# Altium PCB sdc-le-a3l.PcbDoc
Units mm, origin at the board's own origin, x right, y up, seen from the top; angles counter-clockwise.
Board outline 35.8 x 37.7 mm, 2 copper layers (Top Layer, Bottom Layer), stack 1.58 mm thick; 1 components, 0 nets, 36 pads, 0 vias.
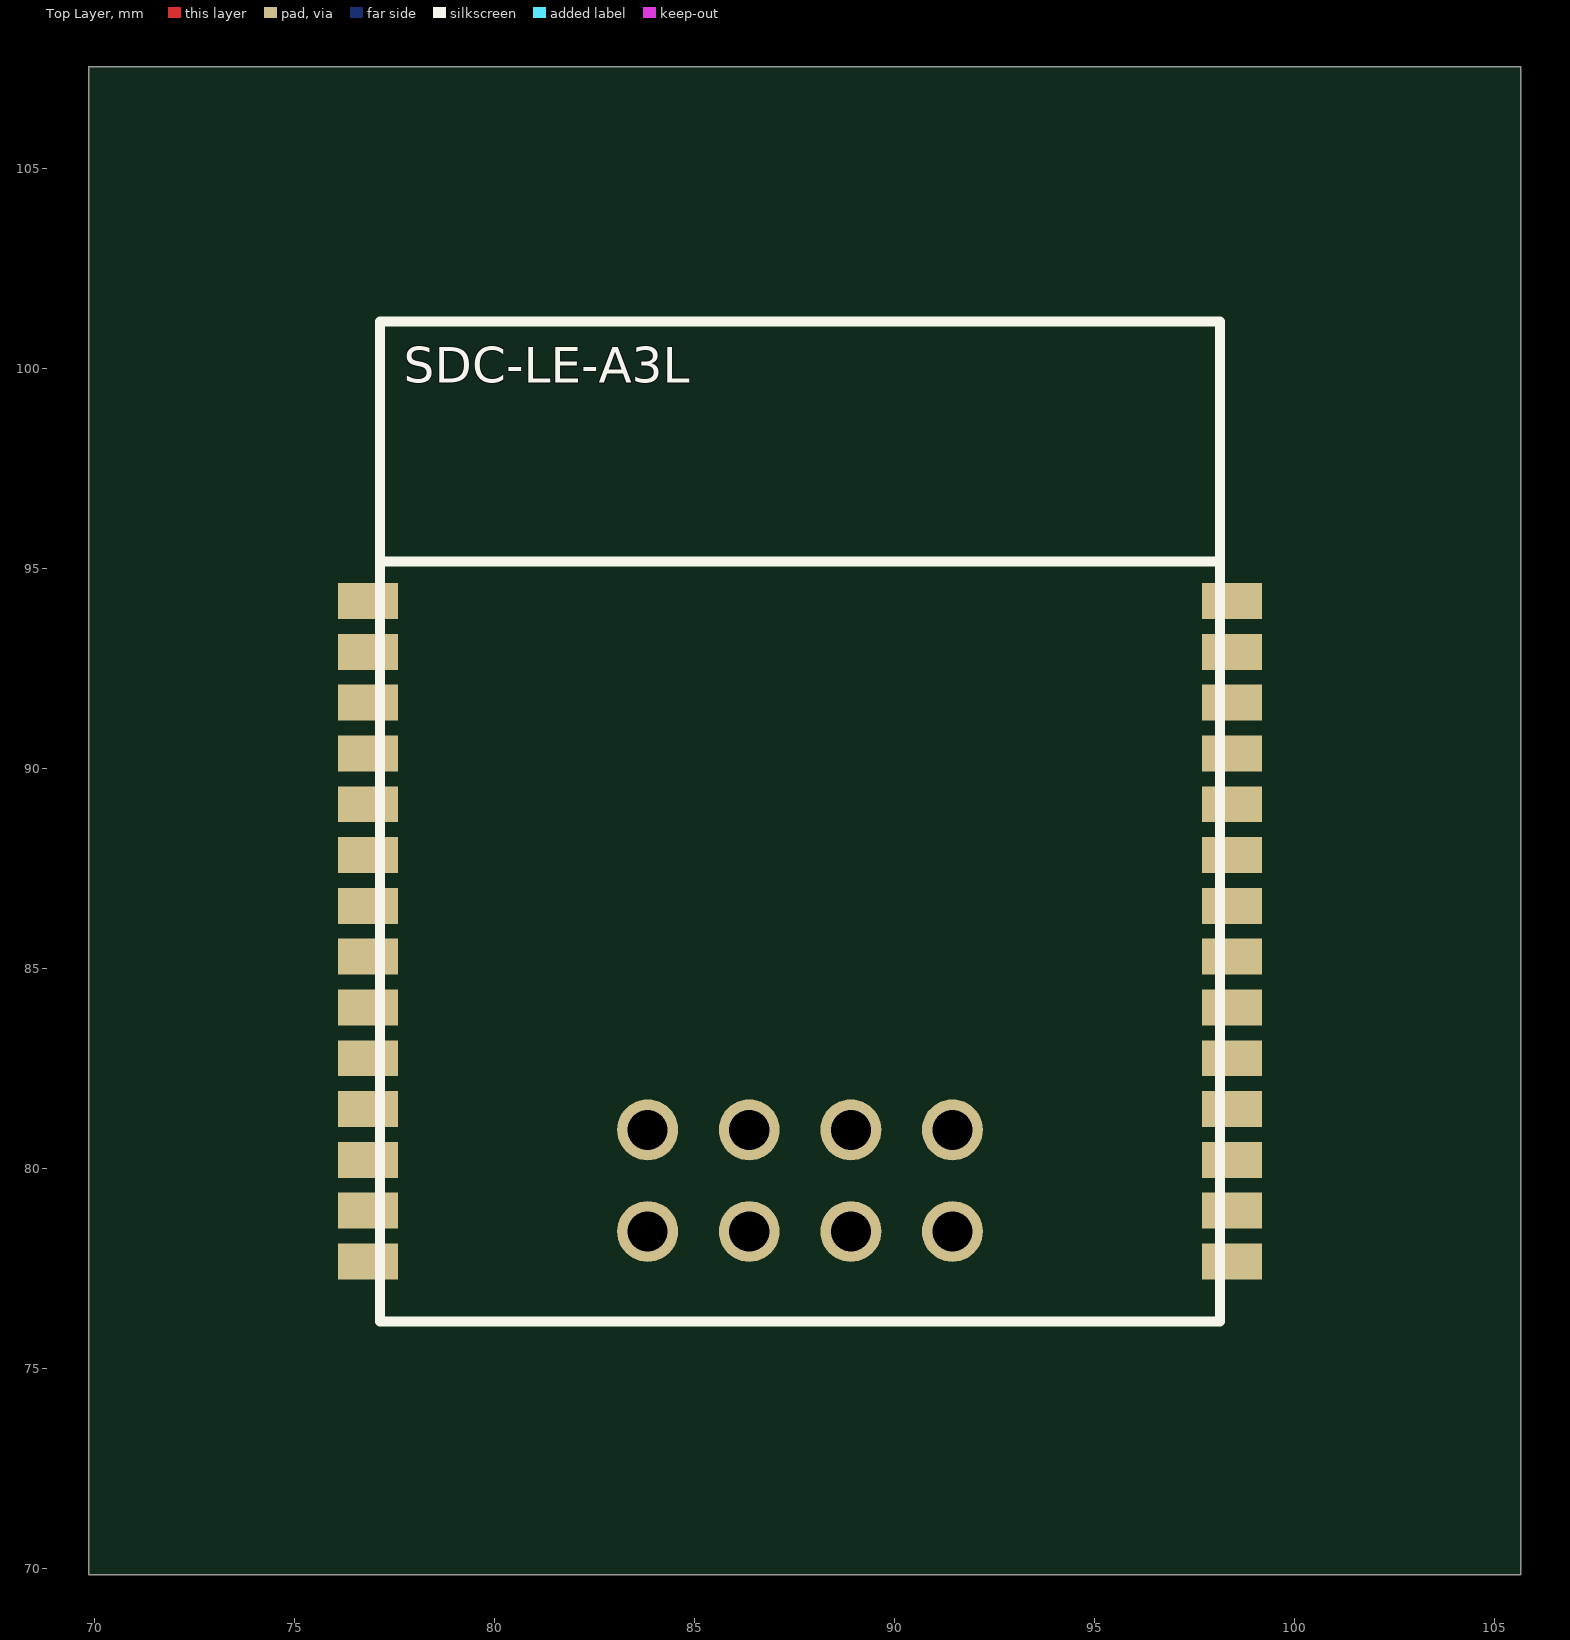
[diagram p0: Top Layer view]
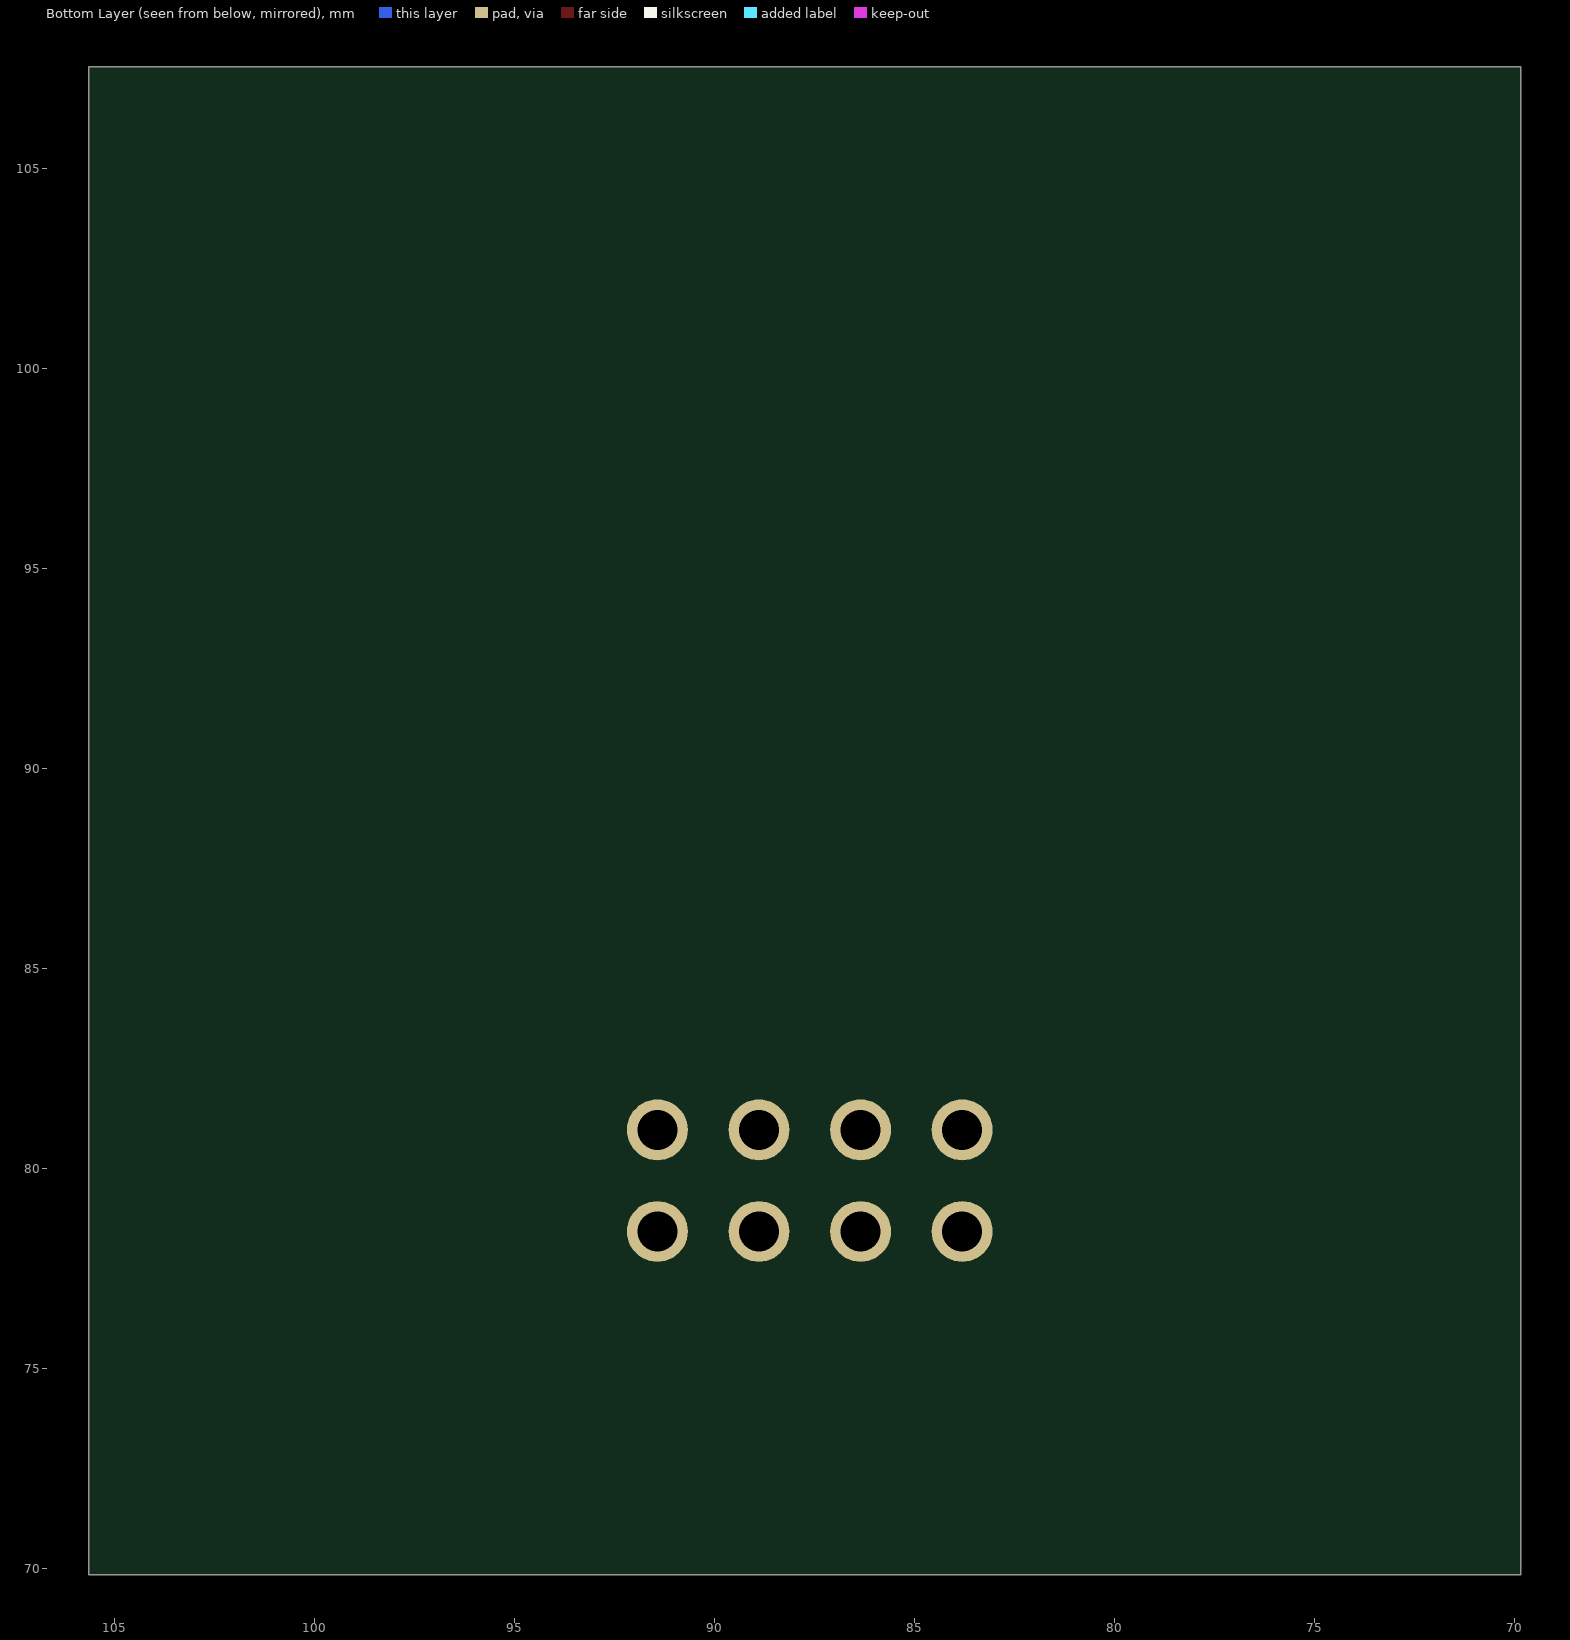
[diagram p1: Bottom Layer view, seen from below]

## Layer stack, top to bottom
Top Solder Mask Layer: solder mask 0.0102, Dk 3.3
Top Layer: signal copper 0.0356
Dielectric1: surface 1.5088, FR4, Dk 4.5
Bottom Layer: signal copper 0.0356
Bottom Solder Mask Layer: solder mask 0.0102, Dk 3.3

## Board outline
105.649,69.85 69.85,69.85 69.85,107.551 105.649,107.551

## Components (designator, comment, footprint, x,y, rotation, side; value= is the part's Value field where it differs from the comment)
? "" SDC-LE-A3L(AB2021A3模组) 76.827,77.688 r0 top

## Footprints (in the part's own frame and the unit in brackets; to place one, negate y for a bottom-side part, rotate by r counter-clockwise, add the part's x,y. Pads: shape width x height; smd on the part's side, far side on the other; paste and mask are expansions set on the pad)
SDC-LE-A3L(AB2021A3模组) [mil]
  rect 59.1x35.4 smd: 1(0,650) 2(0,600) 3(0,550) 4(0,500) 5(0,450) 6(0,400) 7(0,350) 8(0,300) 9(0,250) 10(0,200) 11(0,150) 12(0,100) 13(0,50) 14(0,0) 15(850.4,0) 16(850.4,50) 17(850.4,100) 18(850.4,150) 19(850.4,200) 20(850.4,250) 21(850.4,300) 22(850.4,350) 23(850.4,400) 24(850.4,450) 25(850.4,500) 26(850.4,550) 27(850.4,600) 28(850.4,650)
  round 60 hole 39.4: 29(275.2,129.5) 30(375.2,129.5) 31(475.2,129.5) 32(575.2,129.5) 33(275.2,29.5) 34(375.2,29.5) 35(475.2,29.5) 36(575.2,29.5)
  silkscreen extent 12,-59 839,925

## Nets (pads, with @x,y where several pads share a name; then routed paths per layer and width w, separated by ;. In a path a pad name is that pad's centre, name@x,y a point inside that pad or via, vN(x,y) a via of type N, cw(c..) or ccw(c..) an arc to the next point about the centre after c; other vN are vias at no path point)
pads on no net: ?.1 ?.2 ?.3 ?.4 ?.5 ?.6 ?.7 ?.8 ?.9 ?.10 ?.11 ?.12 ?.13 ?.14 ?.15 ?.16 ?.17 ?.18 ?.19 ?.20 ?.21 ?.22 ?.23 ?.24 ?.25 ?.26 ?.27 ?.28 ?.29 ?.30 ?.31 ?.32 ?.33 ?.34 ?.35 ?.36

## Text inside footprints (layer, text, board x,y; h text height)
?: Top Silkscreen Layer "SDC-LE-A3L" at 77.716,99.659 h0.89